# Allegro board LAY-97010_A2.brd
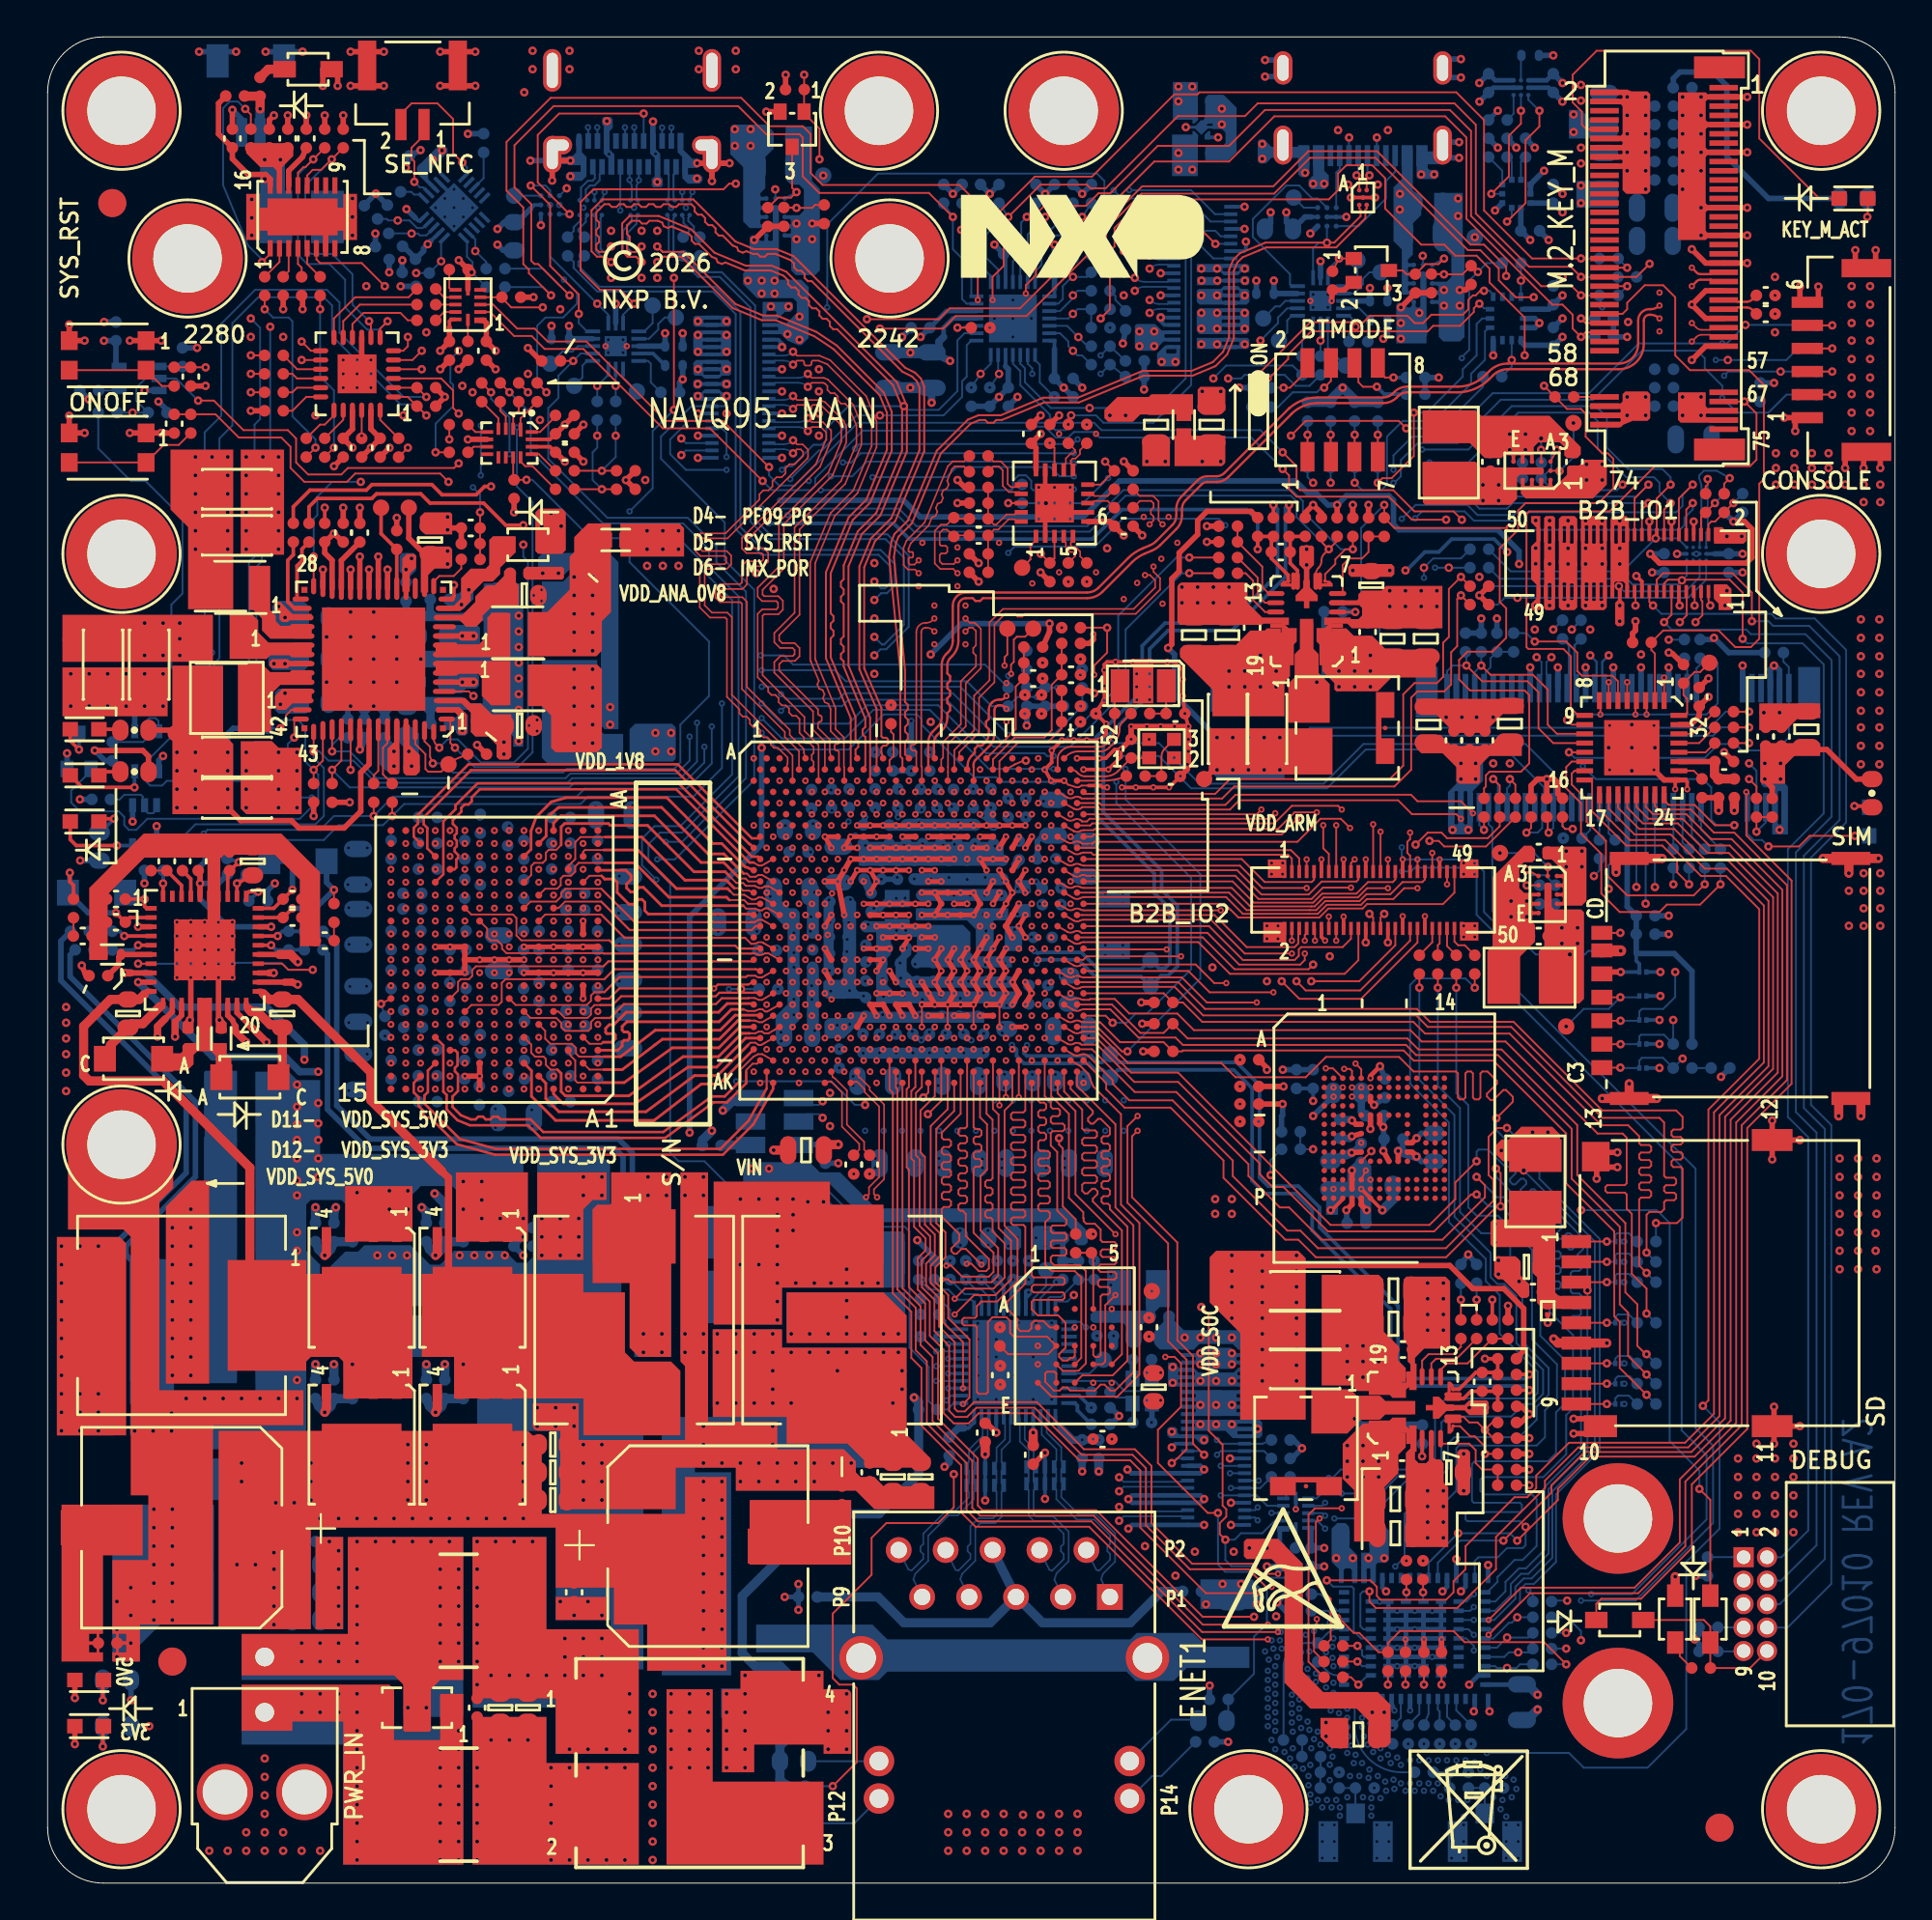
[diagram p0: board, top side]
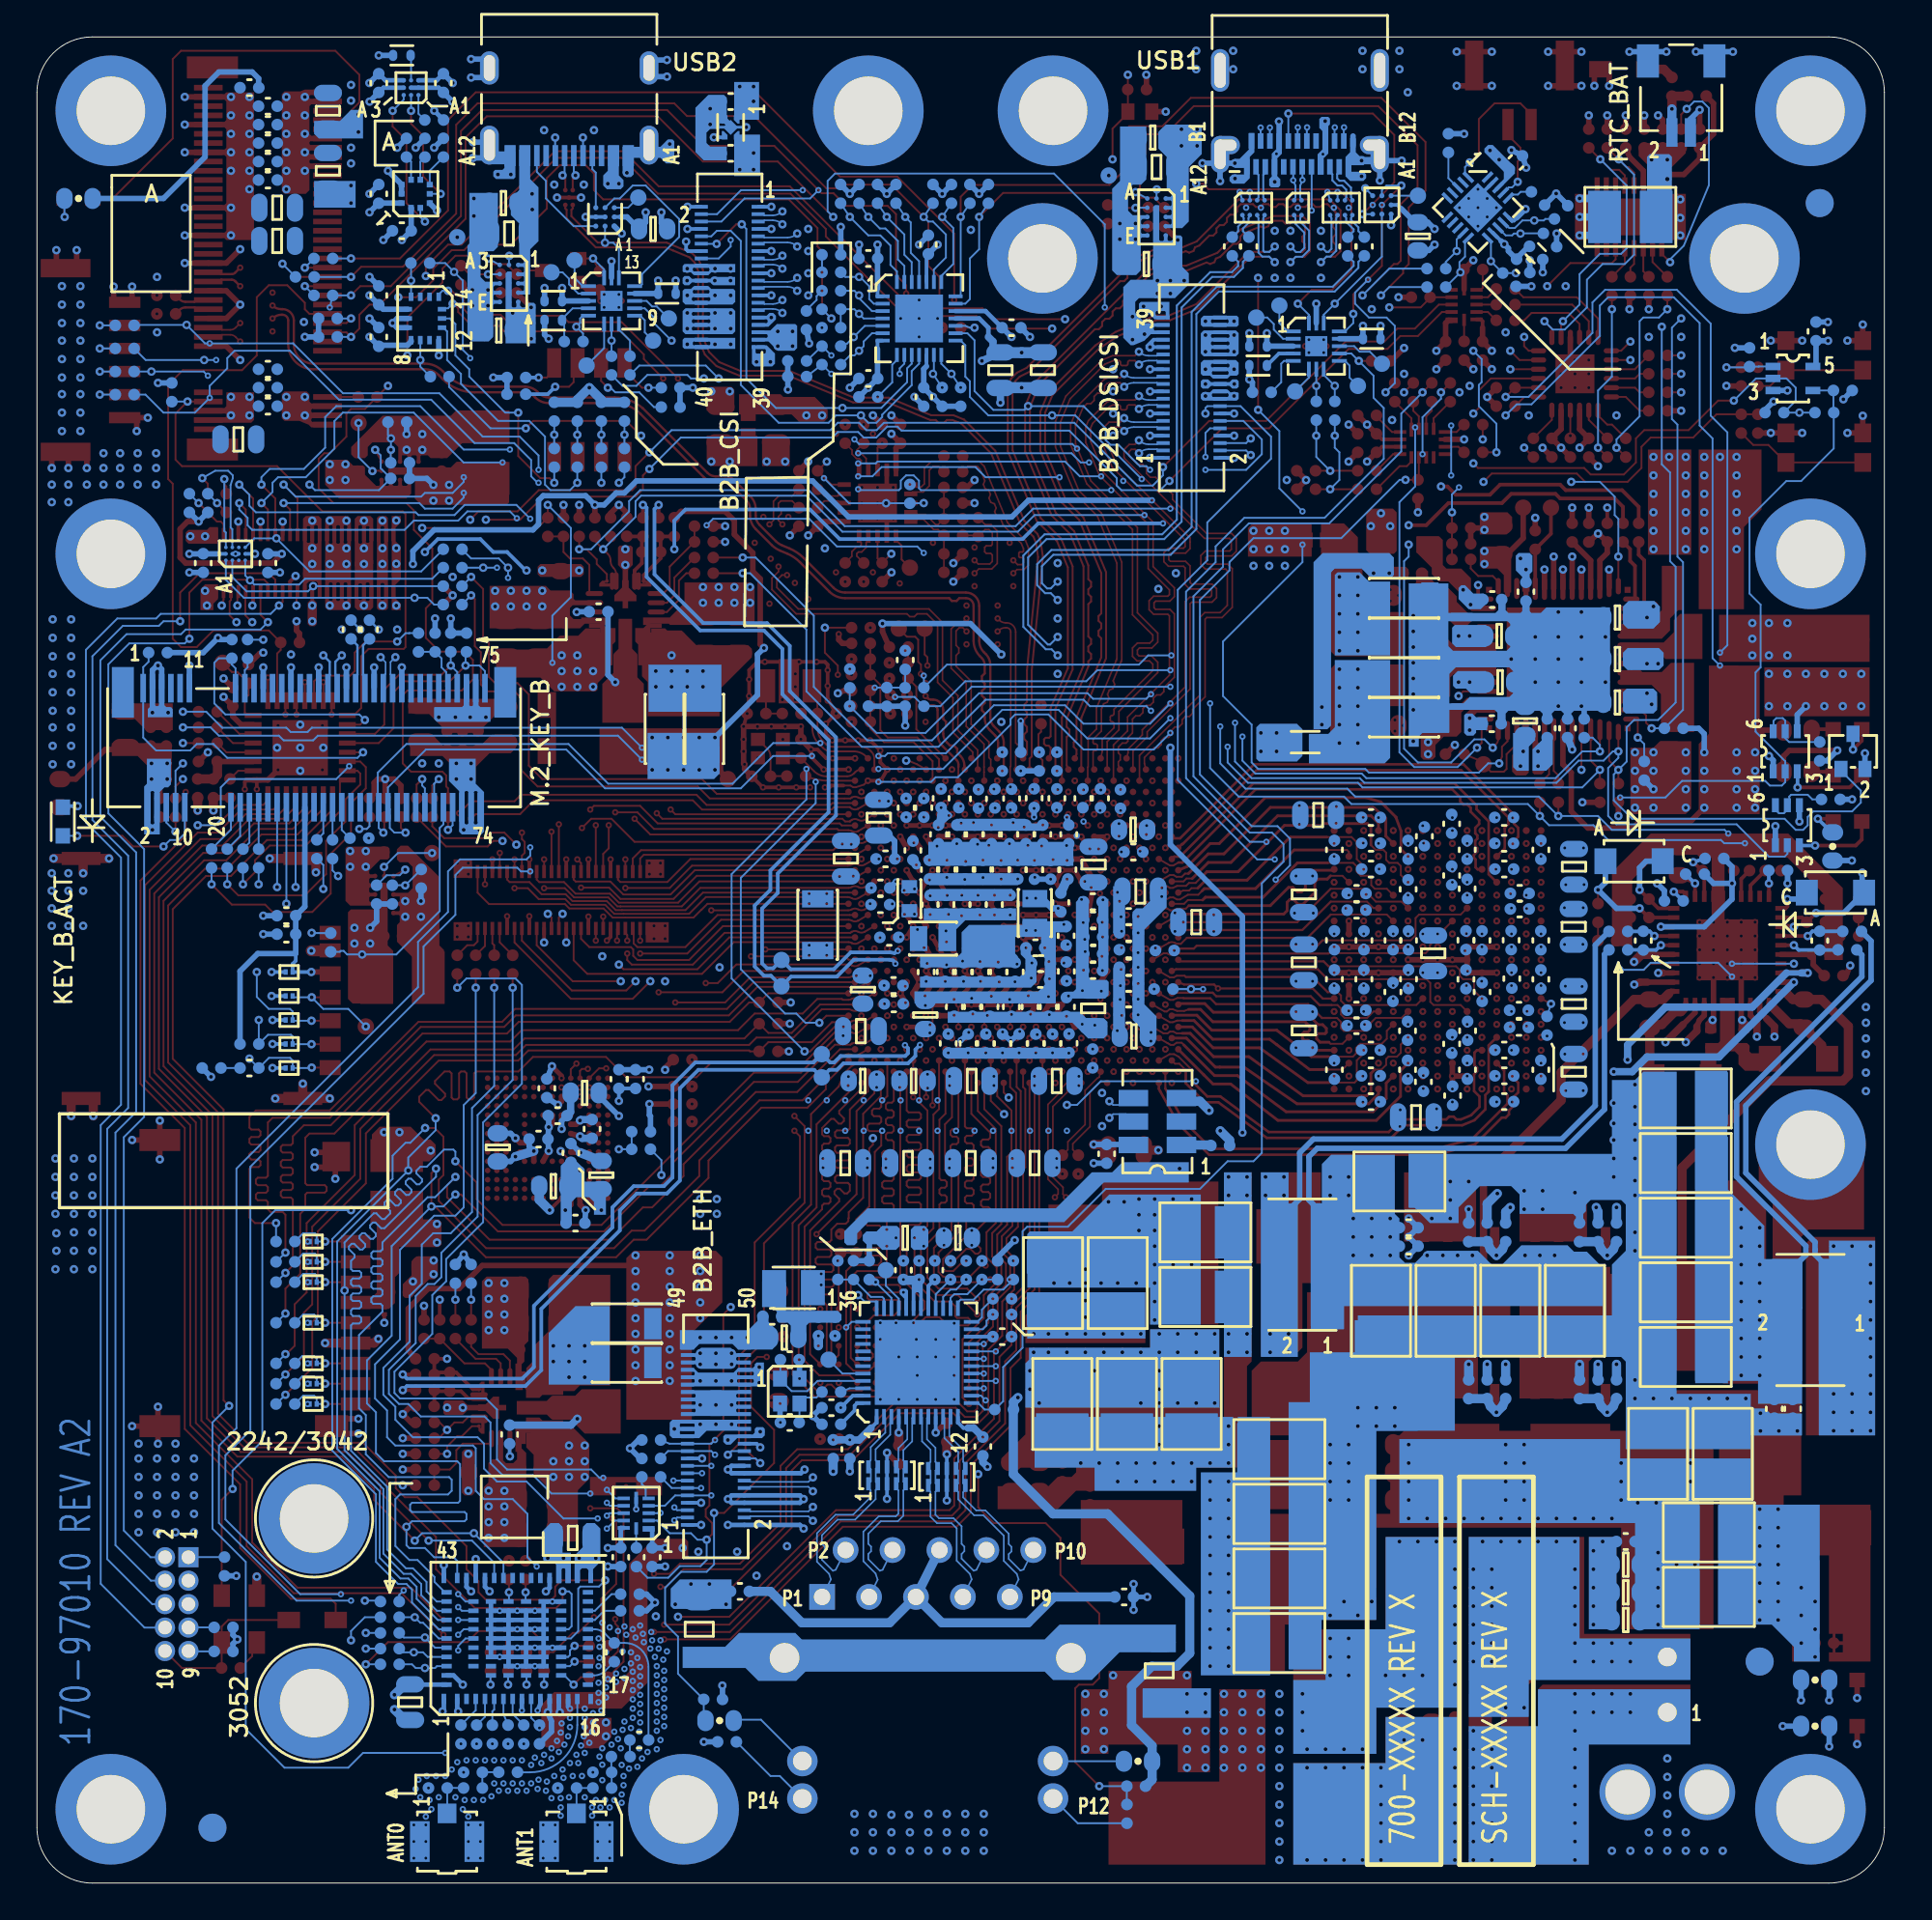
[diagram p1: board, bottom side, seen from below]

Outline 100 x 100 mm; copper layers: TOP, L2_GND1, L3_IN1, L4_GND2, L5_POWER1, L6_POWER2, L7_GND3, L8_IN2, L9_GND4, BOTTOM. Coordinates in mm from the lower left corner of the outline.
Outline path: 0,97 0,3 arc(0.88,0.88) 3,0 97,0 arc(99.12,0.88) 100,3 100,97 arc(99.12,99.12) 97,100 3,100 arc(0.88,99.12) 0,97

## Design rules (mm)
constraint set DEFAULT: min track width 0.102
net group CAN: nets CAN1_RX CAN1_TX
net group ETH_REF_PAD_CLK: nets ETH_REF_PAD_CLK_N ETH_REF_PAD_CLK_P
net group ETH_RX0_N: nets ETH_RX0_N SOC_ETH_RX0_N
net group ETH_RX0_P: nets ETH_RX0_P SOC_ETH_RX0_P
net group ETH_TX0_: nets ETH_TX0_N ETH_TX0_P
net group M2_KEYB_REFCLK_N: nets M2_KEYB_REFCLK_N M2_KEYB_REFCLK_R_N
net group M2_KEYB_REFCLK_P: nets M2_KEYB_REFCLK_P M2_KEYB_REFCLK_R_P
net group M2_KEYM_REFCLK_N: nets M2_KEYM_REFCLK_N M2_KEYM_REFCLK_R_N
net group M2_KEYM_REFCLK_P: nets M2_KEYM_REFCLK_P M2_KEYM_REFCLK_R_P
net group PCIE1_CLKIN_N: nets PCIE1_CLKIN_N PCIE1_CLKIN_R_N
net group PCIE1_CLKIN_P: nets PCIE1_CLKIN_P PCIE1_CLKIN_R_P
net group PCIE1_RX0_: nets PCIE1_RX0_N PCIE1_RX0_P
net group PCIE1_TX0_N: nets N20209195 PCIE1_TX0_N
net group PCIE1_TX0_P: nets N20209186 PCIE1_TX0_P
net group PCIE2_CLKIN_N: nets PCIE2_CLKIN_N PCIE2_CLKIN_R_N
net group PCIE2_CLKIN_P: nets PCIE2_CLKIN_P PCIE2_CLKIN_R_P
net group PCIE2_RX0_: nets PCIE2_RX0_N PCIE2_RX0_P
net group PCIE2_TX0_N: nets N20212275 PCIE2_TX0_N
net group PCIE2_TX0_P: nets N20212266 PCIE2_TX0_P
net group PCIE_CLKOUT_C_N: nets PCIE_CLKOUT_C_N PCIE_CLKOUT_N
net group PCIE_CLKOUT_C_P: nets PCIE_CLKOUT_C_P PCIE_CLKOUT_P
net group PF53_ARM_VMON: nets N20554848 PF53_ARM_VMON
net group PF53_SOC_VMON: nets N20554825 PF53_SOC_VMON
net group SD1_CLK: nets N20187351 SD1_CLK
net group SD2_CD_B: nets N21594290 SD2_CD_B
net group SD2_CLK: nets N20219774 SD2_CLK
net group SD2_CMD: nets N20219761 SD2_CMD
net group SD2_DATA0: nets N20219785 SD2_DATA0
net group SD2_DATA1: nets N20219794 SD2_DATA1
net group SD2_DATA2: nets N20219805 SD2_DATA2
net group SD2_DATA3: nets N20219813 SD2_DATA3
net group USB1_CONN_D: nets USB1_CONN_DN USB1_CONN_DP
net group USB1_CONN_RX0_: nets USB1_CONN_RX0_N USB1_CONN_RX0_P
net group USB1_CONN_RX1_: nets USB1_CONN_RX1_N USB1_CONN_RX1_P
net group USB1_CONN_TX0_: nets USB1_CONN_TX0_N USB1_CONN_TX0_P
net group USB1_CONN_TX1_: nets USB1_CONN_TX1_N USB1_CONN_TX1_P
net group USB1_RX0_: nets USB1_RX0_N USB1_RX0_P
net group USB1_RX1_: nets USB1_RX1_N USB1_RX1_P
net group USB1_TX0_N: nets USB1_TX0_C_N USB1_TX0_N
net group USB1_TX0_P: nets USB1_TX0_C_P USB1_TX0_P
net group USB1_TX1_N: nets USB1_TX1_C_N USB1_TX1_N
net group USB1_TX1_P: nets USB1_TX1_C_P USB1_TX1_P
net group USB2_CONN_D: nets USB2_CONN_DN USB2_CONN_DP
net group USB2_D: nets USB2_DN USB2_DP
net group 50_OHMS_CPWG: nets N20199453 N20199548 N20199550 N20199556 N20199632 N20199634 N20199638 N20199640
net group CLK_SE: nets DEBUG_TCLK_SWCLK GPIO15_SPI8_SCK M2_SMBUS_CLK RTC_CLKOUT_32K SAI2_TX_BCLK SE_SMBUS_CLK UIM_CLK
net group DRAM_DATA_0A: nets DRAM_DATA0_A DRAM_DATA1_A DRAM_DATA2_A
net group I2C: nets I2C2_SCL I2C2_SDA I2C3_SCL I2C3_SDA I2C4_SCL I2C4_SDA
net group I3C: nets I3C1_SCL_1V8 I3C1_SCL_3V3 I3C1_SDA_1V8 I3C1_SDA_3V3 I3C2_SCL_1V8 I3C2_SDA_1V8 I3C2A_SCL_1V8 I3C2A_SDA_1V8 I3C2B_SCL_1V8 I3C2B_SDA_1V8 I3C2C_SCL_1V8 I3C2C_SDA_1V8
net group MIPI_CSI: nets MIPI_CSI_CLK_N MIPI_CSI_D0_N MIPI_CSI_D3_N
net group MIPI_CSI_CLK_: nets MIPI_CSI_CLK_P
net group MIPI_CSI_D0_: nets MIPI_CSI_D0_P
net group MIPI_CSI_D3_: nets MIPI_CSI_D3_P
net group MIPI_DSICSI: nets MIPI_DSICSI_CLK_N MIPI_DSICSI_D0_N MIPI_DSICSI_D1_N MIPI_DSICSI_D2_N MIPI_DSICSI_D3_N
net group MIPI_DSICSI_CLK_: nets MIPI_DSICSI_CLK_P
net group MIPI_DSICSI_D0_: nets MIPI_DSICSI_D0_P
net group MIPI_DSICSI_D1_: nets MIPI_DSICSI_D1_P
net group MIPI_DSICSI_D2_: nets MIPI_DSICSI_D2_P
net group MIPI_DSICSI_D3_: nets MIPI_DSICSI_D3_P
net group POWER: nets DVDD10_RTL N20192671 N20193405 N20193407 N20196046 N20196509 N20196513 N20230991 N20938254 N20938524 N20938526 N20938619 N20938665 N20938713 N20938715 N20938759 N20938761 N20939031 N20939033 N20939085 N20939087 N20939402 N20939416 N20939428 N20939534 N20939536 N22195496 N22196044 N22196802 N22196850 N22209029 N23164149 UIM_PWR VANA_PF09 VCC_LM5143 VDD_BAT VDD_BATF VDD_BBSM_0V8 VDDA_LM5143 VDIG_PF09 VSS_BAT VSS_BATF
net group RTL8211_TD1_: nets RTL8211_TD1_P
net group RTL8211_TD2_: nets RTL8211_TD2_P
net group RTL8211_TD3_: nets RTL8211_TD3_P
net group RTL8211_TD4_: nets RTL8211_TD4_P
net group SD1: nets SD2_RESET_B
net group SD2: nets SD2_VSEL
net group SPI1: nets SPI1_IMU1_PCS0/BT_MODE2 SPI1_IMU1_SCK/BT_MODE3 SPI1_IMU1_SIN SPI1_IMU1_SOUT
net group SPI4: nets SPI4_PCS0 SPI4_PCS1 SPI4_PCS2 SPI4_SCK SPI4_SIN SPI4_SOUT
net group SPI4_1V8: nets SPI4_PCS0_1V8 SPI4_SCK_1V8 SPI4_SIN_1V8 SPI4_SOUT_1V8
net group VSENSE_VMON_FB: nets N20938813 N20938851 N20939149 N20939151 N20939169 N20939171 PF53_ARM_FB- PF53_SOC_FB- PMIC_XFB VDD_ARM_SENSE VDD_SOC_SENSE VSS_ARM_SENSE VSS_SOC_SENSE

## Placement (name value [footprint] x y rotation side)
BH1  MH3.7_6  [MH236-146P]  4 96 0 top
BH2  MH3.7_6  [MH236-146P]  45 96 0 top
BH3  MH3.7_6  [MH236-146P]  55 96 0 top
BH4  MH3.7_6  [MH236-146P]  96 96 0 top
BH5  MH3.7_6  [MH236-146P]  85 19.75 90 bottom
BH6  MH3.7_6  [MH236-146P]  45.58 88 0 top
BH7  MH3.7_6  [MH236-146P]  4 72 0 top
BH8  MH3.7_6  [MH236-146P]  96 72 0 top
BH9  MH3.7_6  [MH236-146P]  4 40 0 top
BH10  MH3.7_6  [MH236-146P]  85 9.75 90 bottom
BH11  MH3.7_6  [MH236-146P]  7.58 88 0 top
BH12  MH3.7_6  [MH236-146P]  4 4 0 top
BH13  MH3.7_6  [MH236-146P]  65 4 0 top
BH14  MH3.7_6  [MH236-146P]  96 4 0 top
C1  0.1uF  [CC0402_25]  10 94.5 90 top
C2  0.1uF  [CC0402_25]  13 94.5 90 top
C3  0.1uF  [CC0402_25]  14 94.5 90 top
C4  0.22uF  [CC0402_25]  93 86 180 top
C5  0.22uF  [CC0402_25]  93 85 180 top
C6  0.1uF  [CC0402_25]  21.75 83 270 top
C7  0.1uF  [CC0402_25]  23.75 83 270 top
C8  100pF  [CC0402_25]  7.75 81.6 270 top
C9  100pF  [CC0402_25]  6.85 79.05 270 top
C10  10uF  [CC0805_OV]  60 79 270 top
C11  10uF  [CC0805_OV]  63 79 90 top
C12  0.1uF  [CC0402_25]  28 78.5 0 top
C13  0.1uF  [CC0402_25]  53.25 78.5 90 top
C14  0.1uF  [CC0402_25]  16 77.75 270 top
C15  0.1uF  [CC0402_25]  18 77.75 270 top
C16  0.1uF  [CC0402_25]  28 77.5 0 top
C17  47uF  [CC1210]  75.84 77.49 90 top
C18  1uF  [CC0402_25]  78.09 76.99 90 top
C19  1uF  [CC0402_25]  82.64 76.99 90 top
C20  22uF  [1206_CC]  10.25 75.5 0 top
C21  0.1uF  [CC0402_25]  50.4 73.9 0 top
C22  0.1uF  [CC0402_25]  58.25 73.5 0 top
C23  0.1uF  [CC0402_25]  22.9 73.4 180 top
C24  1uF  [CC0402_25]  16 73.15 90 top
C25  1uF  [CC0402_25]  16.9 73.15 90 top
C26  22uF  [1206_CC]  10.25 73 0 top
C27  0.1uF  [CC0402_25]  50.4 73 0 top
C28  2.2uF  [CC0603_OV]  20.7 72.75 90 top
C29  220 pF  [CC0402_25]  66.75 72.1 0 top
C30  4.7uF  [CC0603_OV]  71.65 70.3 90 top
C31  4.7uF  [CC0603_OV]  25.8 69.75 0 top
C32  0.1uF  [CC0402_25]  65.2 68 270 top
C33  0.1uF  [CC0402_25]  71.45 67.77 270 top
C34  10uF  [CC0805_OV]  62.05 67.6 270 top
C35  10uF  [CC0805_OV]  63.85 67.6 270 top
C36  10uF  [CC0805_OV]  72.8 67.4 270 top
C37  10uF  [CC0805_OV]  74.6 67.4 270 top
C38  22uF  [1206_CC]  3 66 270 top
C39  22uF  [1206_CC]  5.5 66 270 top
C40  0.1uF  [CC0402_25]  55.4 65.45 0 top
C41  0.1uF  [CC0402_25]  53.35 65.25 0 top
C42  0.1uF  [CC0402_25]  89.4 64.25 90 top
C43  10pF  [CC0402_25]  57.25 63.35 180 top
C44  10pF  [CC0402_25]  61.05 63.35 0 top
C45  0.1uF  [CC0402_25]  55.4 62.9 0 top
C46  10uF  [CC0805_OV]  74.75 62.75 90 top
C47  10uF  [CC0805_OV]  79.15 62.8 90 top
C48  4.7uF  [CC0603_OV]  25.55 62.7 0 top
C49  47uF  [1206_CC]  63.9 62.52 90 top
C50  47uF  [1206_CC]  66 62.52 90 top
C51  10uF  [CC0805_OV]  95.2 62.5 90 top
C52  0.1uF  [CC0402_25]  93 62.1 90 top
C53  0.1uF  [CC0402_25]  93.85 62.1 90 top
C54  0.1uF  [CC0402_25]  76.12 61.9 90 top
C55  0.1uF  [CC0402_25]  76.96 61.9 90 top
C56  0.1uF  [CC0402_25]  77.8 61.9 90 top
C57  12pF  [CC0402_25]  58.65 61.45 90 top
C58  22uF  [1206_CC]  10.25 61 0 top
C59  0.1uF  [CC0402_25]  90.75 60.75 0 top
C60  12pF  [CC0402_25]  60.8 59.95 0 top
C61  22uF  [1206_CC]  10.25 58.75 0 top
C62  1uF  [CC0402_25]  80.71 55.84 180 top
C63  0.01uF  [CC0402_25]  6.45 55.35 90 top
C64  0.47uF  [CC0402_25]  8.15 55.35 90 top
C65  0.82uF  [CC0603_OV]  11.1 55.35 90 top
C66  0.22uF  [CC0402_25]  3.7 53.3 180 top
C67  0.22uF  [CC0402_25]  13.25 53.3 0 top
C68  2.7pF  [CC0402_25]  3.7 52.05 180 top
C69  6.8pF  [CC0402_25]  13.25 52.3 0 top
C70  470pF  [CC0402_25]  1.9 51.3 0 top
C71  1uF  [CC0402_25]  80.71 51.29 180 top
C72  680pF  [CC0402_25]  15 51.05 180 top
C73  2.2uF  [CC0402_TOL0P2_OV]  3.5 50.3 180 top
C74  47uF  [CC1210]  80.21 49.04 180 top
C75  0.1uF  [CC0603_OV]  4.35 47.1 90 top
C76  0.1uF  [CC0603_OV]  12.7 47.1 90 top
C77  2.2uF  [CC0402_TOL0P2_OV]  7.6 45.75 90 top
C78  2.2uF  [CC0402_TOL0P2_OV]  9.4 45.75 90 top
C79  0.1uF  [CC0402_25]  43.63 38.92 270 top
C80  0.1uF  [CC0402_25]  44.5 38.92 270 top
C81  47uF  [CC1210]  80.53 38.01 90 top
C82  4.7uF  [CC0603_OV]  80.05 33.38 180 top
C83  10uF  [CC0805_OV]  72.85 32.1 180 top
C84  47uF  [1206_CC]  68.07 32.05 0 top
C85  0.1uF  [CC0402_25]  80.4 32.01 180 top
C86  10uF  [CC0805_OV]  72.85 30.3 180 top
C87  0.1uF  [CC0402_25]  59.62 30.11 90 top
C88  47uF  [1206_CC]  68.07 29.95 0 top
C89  0.1uF  [CC0402_25]  73.37 28.9 180 top
C90  47uF  [1206_CC]  68.07 27.85 0 top
C91  0.1uF  [CC0402_25]  51.57 27.51 270 top
C92  220 pF  [CC0402_25]  77.65 27.15 270 top
C93  4.7uF  [CC0603_OV]  59.87 26.86 270 top
C94  0.1uF  [CC0402_25]  57.1 24.05 0 top
C95  0.01uF  [CC0603_OV]  27.35 23.75 0 top
C96  0.1uF  [CC0402_25]  73.32 22.45 180 top
C97  0.1uF  [CC0603_OV]  27.35 22.25 0 top
C98  4.7uF  [CC0603_OV]  75.85 22.25 0 top
C99  0.1uF  [CC0603_OV]  45.75 22 270 top
C100  0.01uF  [CC0603_OV]  47.25 22 270 top
C101  1000pF  [CC0402_25]  44.5 22.25 270 top
C102  10uF  [CC0805_OV]  72.95 20.8 180 top
C103  0.01uF  [CC0603_OV]  27.35 20.75 0 top
C104  47uF  [CCE10_3X10_3_413H]  7.25 19.25 180 top
C105  10uF  [CC0805_OV]  72.95 18.95 180 top
C106  47uF  [CCE10_3X10_3_413H]  35.75 18.25 0 top
C107  1000pF  [CC0402_25]  14 18.5 0 bottom
C108  1000pF  [CC0402_25]  28.5 15.75 270 top
C109  0.01uF  [CC0603_OV]  14 17.25 0 bottom
C110  0.01uF  [CC0603_OV]  14 15.75 0 bottom
C111  0.1uF  [CC0603_OV]  14 14.25 0 bottom
C112  10uF  [CC0805_OV]  70.95 8.05 180 top
C113  1uF  [FLTR4_1206_SM]  20 9.5 180 top
C114  1000pF  [CC0402_25]  23.25 9.5 90 top
C115  0.01uF  [CC0603_OV]  24.5 9.5 90 top
C116  0.1uF  [CC0603_OV]  26 9.5 90 top
C117  2.2uF  [CC0402_TOL0P2_OV]  80.25 99 0 bottom
C118  0.1uF  [CC0402_25]  81.5 97.5 90 bottom
C119  0.1uF  [CC0402_25]  78 97.5 270 bottom
C120  0.1uF  [CC0402_25]  88.5 97.25 0 bottom
C121  0.1uF  [CC0402_25]  87.5 96.25 0 bottom
C122  10uF  [CC0805_OV]  84.25 96 270 bottom
C123  1uF  [CC0402_25]  62.45 96.5 0 bottom
C124  1uF  [CC0402_25]  62.45 93.7 0 bottom
C125  0.1uF  [CC0402_25]  87.5 95.25 0 bottom
C126  1uF  [CC0603_OV]  39.6 94.55 0 bottom
C127  0.1uF  [CC0402_25]  87.5 94.25 0 bottom
C128  0.1uF  [CC0402_25]  87.5 93.25 0 bottom
C129  0.1uF  [CC0402_25]  19.95 93.2 135 bottom
C130  10uF  [CC0805_OV]  39.4 92.95 0 bottom
C131  10uF  [CC0805_OV]  84.25 92.75 270 bottom
C132  0.1uF  [CC0402_25]  87.5 92.25 0 bottom
C133  0.1uF  [CC0402_25]  81.5 91.5 90 bottom
C134  1uF  [CC0603_OV]  74.75 91 0 bottom
C135  10uF  [CC0805_OV]  87 90.75 0 bottom
C136  47uF  [CC1210]  13.75 90.25 0 bottom
C137  1uF  [CC0603_OV]  66.65 89.6 180 bottom
C138  0.1uF  [CC0402_25]  80.25 89.5 0 bottom
C139  10uF  [CC0805_OV]  74.45 89.35 0 bottom
C140  1uF  [CC0603_OV]  25.25 89.2 270 bottom
C141  10uF  [CC0805_OV]  87 88.95 0 bottom
C142  1uF  [CC0402_25]  51.75 88.75 90 bottom
C143  0.1uF  [CC0402_25]  35.3 88.65 270 bottom
C144  0.1uF  [CC0402_25]  34.4 88.65 270 bottom
C145  0.1uF  [CC0402_25]  29.05 88.65 270 bottom
C146  0.1uF  [CC0402_25]  28.15 88.65 270 bottom
C147  1uF  [CC0402_25]  55 88 0 bottom
C148  1uF  [CC0603_OV]  39.95 87.7 0 bottom
C149  0.1uF  [CC0402_25]  19.55 87.6 225 bottom
C150  2.2uF  [CC0402_TOL0P2_OV]  65.9 86.1 180 bottom
C151  0.1uF  [CC0402_25]  81.5 86 90 bottom
C152  2.2uF  [CC0402_TOL0P2_OV]  72.05 85.7 0 bottom
C153  2.2uF  [CC0402_TOL0P2_OV]  72.05 84.65 0 bottom
C154  1uF  [CC0402_25]  47.25 84.25 180 bottom
C155  1uF  [CC0603_OV]  75 84.1 0 bottom
C156  0.1uF  [CC0402_25]  3.7 84.05 90 bottom
C157  0.1uF  [CC0402_25]  81.5 83.75 90 bottom
C158  2.2uF  [CC0402_TOL0P2_OV]  27.75 83.65 180 bottom
C159  2.2uF  [CC0402_TOL0P2_OV]  33.9 83.25 0 bottom
C160  2.2uF  [CC0402_TOL0P2_OV]  33.9 82.2 0 bottom
C161  0.1uF  [CC0402_25]  87.5 82 0 bottom
C162  10uF  [CC0805_OV]  47.85 81.95 270 bottom
C163  10uF  [CC0805_OV]  45.55 81.95 270 bottom
C164  1uF  [CC0402_25]  55 81.5 0 bottom
C165  0.1uF  [CC0402_25]  87.5 81 0 bottom
C166  1uF  [CC0402_25]  52 80.5 270 bottom
C167  0.1uF  [CC0402_25]  87.5 80 0 bottom
C168  10uF  [CC0805_OV]  89.1 78.2 0 bottom
C169  0.1uF  [CC0402_25]  91 71.5 270 bottom
C170  0.1uF  [CC0402_25]  87.5 71.5 270 bottom
C171  1uF  [CC0402_25]  19.4 69.95 270 bottom
C172  22uF  [1206_CC]  26 69.6 180 bottom
C173  1uF  [CC0402_25]  21.22 69.53 180 bottom
C174  0.1uF  [CC0402_25]  69.6 68.87 180 bottom
C175  4.7uF  [CC0603_OV]  14.45 68.55 0 bottom
C176  0.22uF  [CC0402_25]  83 67.9 270 bottom
C177  0.22uF  [CC0402_25]  82 67.9 270 bottom
C178  4.7uF  [CC0603_OV]  20.85 67.55 180 bottom
C179  22uF  [1206_CC]  26 67.45 180 bottom
C180  4.7uF  [CC0603_OV]  14.45 66.3 0 bottom
C181  1000pF  [CC0402_25]  53 66.25 90 bottom
C182  22uF  [1206_CC]  26 65.3 180 bottom
C183  4.7uF  [CC0603_OV]  20.8 65.05 180 bottom
C184  4.7uF  [CC0603_OV]  14.45 63.95 0 bottom
C185  22uF  [1206_CC]  26 63.15 180 bottom
C186  4.7uF  [CC0603_OV]  19.45 62.95 90 bottom
C187  1uF  [CC0402_25]  21.25 62.8 180 bottom
C188  1uF  [CC0402_25]  18.25 62.55 90 bottom
C189  1uF  [CC0402_25]  17.15 62.55 90 bottom
C190  47uF  [1206_CC]  66 62.52 90 bottom
C191  47uF  [1206_CC]  63.9 62.52 90 bottom
C192  1uF  [CC0402_25]  46.02 58.77 90 bottom
C193  1uF  [CC0402_25]  51.06 58.76 90 bottom
C194  1uF  [CC0402_25]  44.79 58.76 90 bottom
C195  1uF  [CC0402_25]  43.39 58.76 90 bottom
C196  1uF  [CC0402_25]  42.43 58.76 90 bottom
C197  1uF  [CC0402_25]  47.24 58.75 90 bottom
C198  1uF  [CC0402_25]  49.04 58.73 90 bottom
C199  10uF  [CC0805_OV]  30.65 57.85 0 bottom
C200  1uF  [CC0402_25]  52.95 58.25 90 bottom
C201  1uF  [CC0402_25]  51.99 58.25 90 bottom
C202  1uF  [CC0402_25]  20.58 57.72 0 bottom
C203  1uF  [CC0402_25]  27.79 57.72 180 bottom
C204  10uF  [CC0805_OV]  54.43 57.71 90 bottom
C205  1uF  [CC0402_25]  23.42 57.38 270 bottom
C206  2.2uF  [CC0603_OV]  40.67 57.06 180 bottom
C207  1uF  [CC0402_25]  51.2 56.81 270 bottom
C208  1uF  [CC0402_25]  50.21 56.81 270 bottom
C209  1uF  [CC0402_25]  49.24 56.81 270 bottom
C210  0.1uF  [CC0402_25]  48.33 56.81 270 bottom
C211  1uF  [CC0402_25]  47.36 56.81 270 bottom
C212  1uF  [CC0402_25]  46.47 56.81 270 bottom
C213  0.22uF  [CC0402_25]  45.55 56.81 270 bottom
C214  1uF  [CC0402_25]  44.15 56.81 270 bottom
C215  1uF  [CC0402_25]  24.9 56.7 270 bottom
C216  1uF  [CC0402_25]  27.79 56.32 180 bottom
C217  1uF  [CC0402_25]  20.58 56.32 0 bottom
C218  1uF  [CC0402_25]  25.78 55.97 270 bottom
C219  1uF  [CC0402_25]  22.58 55.97 270 bottom
C220  1uF  [CC0402_25]  29.77 55.97 270 bottom
C221  1uF  [CC0402_25]  18.59 55.97 270 bottom
C222  0.1uF  [CC0402_25]  52.59 55.93 90 bottom
C223  1uF  [CC0402_25]  40.65 55.85 180 bottom
C224  10uF  [CC0805_OV]  16.8 55.05 90 bottom
C225  10uF  [CC0805_OV]  56.21 55.49 90 bottom
C226  1uF  [CC0402_25]  54.07 55.48 0 bottom
C227  10uF  [CC0805_OV]  42.81 55.17 90 bottom
C228  1uF  [CC0402_25]  27.79 54.93 0 bottom
C229  1uF  [CC0402_25]  20.57 54.93 180 bottom
C230  0.22uF  [CC0402_25]  51.69 54.9 90 bottom
C231  0.22uF  [CC0402_25]  50.74 54.9 90 bottom
C232  1uF  [CC0402_25]  49.76 54.9 90 bottom
C233  0.22uF  [CC0402_25]  48.8 54.9 90 bottom
C234  0.22uF  [CC0402_25]  47.83 54.9 90 bottom
C235  0.22uF  [CC0402_25]  46.91 54.9 90 bottom
C236  0.1uF  [CC0402_25]  44.19 54.89 90 bottom
C237  0.1uF  [CC0402_25]  46.01 54.89 90 bottom
C238  0.22uF  [CC0402_25]  45.13 54.89 90 bottom
C239  1uF  [CC0402_25]  23.42 54.58 270 bottom
C240  0.1uF  [CC0402_25]  54.35 53.9 0 bottom
C241  1uF  [CC0402_25]  22.58 53.86 270 bottom
C242  1uF  [CC0402_25]  25.78 53.83 270 bottom
C243  10uF  [CC0805_OV]  40.28 53.71 180 bottom
C244  1uF  [CC0402_25]  19.74 53.61 180 bottom
C245  1uF  [CC0402_25]  28.57 53.6 0 bottom
C246  10uF  [CC0805_OV]  31.42 53.55 270 bottom
C247  2.2uF  [0603_CC]  52.78 53.32 270 bottom
C248  0.22uF  [CC0402_25]  44.58 53.12 270 bottom
C249  1uF  [CC0402_25]  42.85 53.16 180 bottom
C250  0.22uF  [CC0402_25]  49.94 53 90 bottom
C251  0.22uF  [CC0402_25]  49.06 53 90 bottom
C252  1uF  [CC0402_25]  48.17 53 90 bottom
C253  0.22uF  [CC0402_25]  47.32 53 90 bottom
C254  0.22uF  [CC0402_25]  51.65 53 90 bottom
C255  0.22uF  [CC0402_25]  50.8 53 90 bottom
C256  1uF  [CC0402_25]  54.35 53 0 bottom
C257  1uF  [CC0402_25]  28.57 52.7 180 bottom
C258  22uF  [1206_CC]  57.74 51.91 270 bottom
C259  1uF  [CC0402_25]  19.74 52.77 0 bottom
C260  10uF  [0805_CC]  45.99 52.54 90 bottom
C261  0.1uF  [CC0402_25]  86.5 52.4 0 bottom
C262  1uF  [CC0402_25]  40.9 52.36 180 bottom
C263  1uF  [CC0402_25]  42.83 52.16 180 bottom
C264  10uF  [CC0805_OV]  16.82 51.8 90 bottom
C265  1uF  [CC0402_25]  53.87 51.23 0 bottom
C266  1uF  [CC0402_25]  40.9 51.47 180 bottom
C267  1uF  [CC0402_25]  86.5 51.4 0 bottom
C268  0.1uF  [CC0402_25]  44.29 51.31 270 bottom
C269  1uF  [CC0402_25]  42.82 51.25 180 bottom
C270  10uF  [0805_CC]  51.5 51.16 0 bottom
C271  1uF  [CC0402_25]  20.2 51.07 270 bottom
C272  1uF  [CC0402_25]  29.77 51.07 270 bottom
C273  1uF  [CC0402_25]  26.6 51.06 270 bottom
C274  1uF  [CC0402_25]  21.78 51.06 270 bottom
C275  1uF  [CC0402_25]  18.6 51.06 270 bottom
C276  1uF  [CC0402_25]  28.17 51.06 270 bottom
C277  1uF  [CC0402_25]  25.76 51.06 90 bottom
C278  1uF  [CC0402_25]  22.65 51.07 90 bottom
C279  33pF  [CC0402_25]  13.05 51.05 90 bottom
C280  33pF  [CC0402_25]  3.5 51.05 270 bottom
C281  1uF  [CC0402_25]  45.96 50.66 0 bottom
C282  1uF  [CC0402_25]  40.9 50.56 180 bottom
C283  10uF  [CC0805_OV]  24.42 50.36 90 bottom
C284  1uF  [CC0402_25]  42.83 50.34 180 bottom
C285  10uF  [CC0805_OV]  31.42 49.87 270 bottom
C286  0.1uF  [CC0402_25]  45.65 49.81 0 bottom
C287  1uF  [CC0402_25]  40.9 49.61 180 bottom
C288  1uF  [CC0402_25]  42.83 49.43 180 bottom
C289  1uF  [CC0402_25]  44.28 49.38 270 bottom
C290  1uF  [CC0402_25]  47.05 49.35 270 bottom
C291  0.22uF  [CC0402_25]  51.87 49.35 270 bottom
C292  1uF  [CC0402_25]  50.84 49.35 270 bottom
C293  0.22uF  [CC0402_25]  49.84 49.35 270 bottom
C294  1uF  [CC0402_25]  48.92 49.35 270 bottom
C295  0.1uF  [CC0402_25]  47.95 49.35 270 bottom
C296  1uF  [CC0402_25]  20.17 48.99 90 bottom
C297  1uF  [CC0402_25]  25.76 48.96 270 bottom
C298  1uF  [CC0402_25]  29.77 48.96 90 bottom
C299  1uF  [CC0402_25]  28.18 48.96 90 bottom
C300  1uF  [CC0402_25]  18.6 48.95 90 bottom
C301  1uF  [CC0402_25]  22.65 48.95 270 bottom
C302  1uF  [CC0402_25]  45.7 48.95 0 bottom
C303  1uF  [CC0402_25]  40.9 48.73 180 bottom
C304  1uF  [CC0402_25]  53.63 48.62 0 bottom
C305  2.2uF  [CC0603_OV]  55.29 48.4 90 bottom
C306  1uF  [CC0402_25]  26.61 48.27 270 bottom
C307  1uF  [CC0402_25]  21.77 48.27 270 bottom
C308  1uF  [CC0402_25]  40.9 47.88 180 bottom
C309  1uF  [CC0402_25]  53.62 47.63 0 bottom
C310  10uF  [CC0805_OV]  16.82 47.62 270 bottom
C311  1uF  [CC0402_25]  50.34 47.46 270 bottom
C312  0.1uF  [CC0402_25]  49.36 47.46 270 bottom
C313  1uF  [CC0402_25]  48.42 47.46 270 bottom
C314  1uF  [CC0402_25]  44.27 47.46 270 bottom
C315  1uF  [CC0402_25]  47.26 47.46 270 bottom
C316  1uF  [CC0402_25]  46.24 47.46 270 bottom
C317  0.1uF  [CC0402_25]  45.25 47.46 270 bottom
C318  10uF  [CC0805_OV]  42.83 47.38 270 bottom
C319  1uF  [CC0402_25]  28.58 47.28 180 bottom
C320  1uF  [CC0402_25]  19.78 47.28 0 bottom
C321  1uF  [CC0402_25]  40.9 47.03 180 bottom
C322  2.2uF  [CC0603_OV]  51.92 47.02 270 bottom
C323  1uF  [CC0402_25]  19.78 46.35 180 bottom
C324  1uF  [CC0402_25]  28.58 46.44 0 bottom
C325  10uF  [CC0805_OV]  31.42 46.19 90 bottom
C326  1uF  [CC0402_25]  25.81 46.17 90 bottom
C327  1uF  [CC0402_25]  22.56 46.16 90 bottom
C328  10uF  [CC0805_OV]  55.4 46.15 0 bottom
C329  2.2uF  [CC0603_OV]  40.63 45.86 180 bottom
C330  1uF  [CC0402_25]  44.13 45.49 270 bottom
C331  1uF  [CC0402_25]  50.67 45.48 270 bottom
C332  1uF  [CC0402_25]  49.59 45.48 270 bottom
C333  1uF  [CC0402_25]  48.64 45.48 270 bottom
C334  1uF  [CC0402_25]  47.73 45.48 270 bottom
C335  1uF  [CC0402_25]  46.84 45.48 270 bottom
C336  1uF  [CC0402_25]  45.93 45.48 270 bottom
C337  1uF  [CC0402_25]  45.03 45.48 270 bottom
C338  1uF  [CC0402_25]  23.42 45.46 90 bottom
C339  1uF  [CC0402_25]  27.79 45.12 0 bottom
C340  1uF  [CC0402_25]  20.58 45.12 180 bottom
C341  47pF  [CC0402_25]  88.5 44.15 0 bottom
C342  1uF  [CC0402_25]  25.81 44.06 90 bottom
C343  1uF  [CC0402_25]  22.57 44.06 90 bottom
C344  1uF  [CC0402_25]  18.6 44.06 90 bottom
C345  1uF  [CC0402_25]  29.77 44.06 90 bottom
C346  10uF  [CC0805_OV]  16.82 43.95 270 bottom
C347  1uF  [CC0402_25]  20.57 43.73 0 bottom
C348  1uF  [CC0402_25]  27.8 43.73 180 bottom
C349  0.22uF  [CC0402_25]  68.5 43.55 90 bottom
C350  2.2uF  [CC0603_OV]  52.55 43.45 180 bottom
C351  2.2uF  [CC0603_OV]  55.3 43.45 0 bottom
C352  1uF  [CC0402_25]  24.95 43.4 90 bottom
C353  0.22uF  [CC0402_25]  72.4 43.05 90 bottom
C354  1uF  [CC0402_25]  67.6 43.55 90 bottom
C355  1uF  [CC0402_25]  23.37 42.65 90 bottom
C356  10uF  [CC0805_OV]  49.4 43.45 0 bottom
C357  10uF  [CC0805_OV]  44.8 43.45 180 bottom
C358  1uF  [CC0402_25]  20.58 42.33 0 bottom
C359  1uF  [CC0402_25]  27.79 42.33 180 bottom
C360  47uF  [CC1210]  10.75 42.5 0 bottom
C361  0.22uF  [CC0402_25]  71.82 41.57 0 bottom
C362  10uF  [CC0805_OV]  25.36 41.48 180 bottom
C363  0.1uF  [CC0402_25]  42.1 39.5 270 bottom
C364  0.22uF  [CC0402_25]  69.95 40.85 270 bottom
C365  10uF  [CC0805_OV]  41.05 39.7 180 top
C366  0.22uF  [CC0402_25]  72.85 40.3 180 bottom
C367  4.7uF  [CC0603_OV]  75.05 39.85 90 bottom
C368  0.22uF  [CC0402_25]  71.1 39.55 90 bottom
C369  10uF  [CC0805_OV]  56.25 39 0 bottom
C370  10uF  [CC0805_OV]  52.85 39 0 bottom
C371  10uF  [CC0805_OV]  49.45 39 0 bottom
C372  10uF  [CC0805_OV]  46 39 0 bottom
C373  10uF  [CC0805_OV]  37.25 52.05 180 bottom
C374  4.7uF  [CC0603_OV]  72.05 37.75 0 bottom
C375  4.7uF  [CC0603_OV]  70.35 42.8 180 bottom
C376  47uF  [CC1210]  10.75 39 0 bottom
C377  0.22uF  [CC0402_25]  70.85 35.75 180 bottom
C378  47uF  [CC1210]  16.75 31 270 bottom
C379  47uF  [CC1210]  26.25 38 180 bottom
C380  0.01uF  [CC0402_25]  25.75 34.5 180 bottom
C381  0.1uF  [CC0402_25]  25.75 35.5 180 bottom
C382  0.01uF  [CC0402_25]  4.96 25.69 270 bottom
C383  10uF  [CC1210]  36.75 35.25 180 bottom
C384  4.7uF  [CC0603_OV]  69.45 38.35 90 bottom
C385  47uF  [CC1210]  10.75 35.5 0 bottom
C386  0.1uF  [CC0402_25]  5.96 25.69 270 bottom
C387  4.7uF  [CC0603_OV]  53 34.95 180 bottom
C388  4.7uF  [CC0603_OV]  50.15 34.95 180 bottom
C389  10uF  [CC1210]  36.75 31.75 180 bottom
C390  47uF  [1206_CC]  68.07 30.3 0 bottom
C391  0.1uF  [CC0402_25]  53.1 33.2 90 bottom
C392  0.1uF  [CC0402_25]  52.25 33.2 90 bottom
C393  0.1uF  [CC0402_25]  51.4 33.2 90 bottom
C394  10uF  [CC1210]  45 32.5 270 bottom
C395  10uF  [CC1210]  41.5 32.5 270 bottom
C396  47uF  [CC1210]  10.75 32 0 bottom
C397  47uF  [CC1210]  23.75 31 270 bottom
C398  47uF  [CC1210]  20.25 31 270 bottom
C399  47uF  [CC1210]  27.25 31 270 bottom
C400  47uF  [1206_CC]  68.07 28.2 0 bottom
C401  0.1uF  [CC0402_25]  60.2 30.7 0 bottom
C402  0.1uF  [CC0402_25]  47.75 29.6 180 bottom
C403  47uF  [CC1210]  10.75 28.5 0 bottom
C404  4.7uF  [CC0603_OV]  59.55 29.55 0 bottom
C405  27pF  [CC0402_25]  59.25 28.35 180 bottom
C406  10uF  [CC1210]  44.5 25.95 270 bottom
C407  10uF  [CC1210]  41 25.95 270 bottom
C408  10uF  [CC1210]  37.5 25.95 270 bottom
C409  0.1uF  [CC0402_25]  57 25.75 0 bottom
C410  0.1uF  [CC0402_25]  74.42 24.3 90 bottom
C411  10uF  [CC1210]  32.75 23.5 180 bottom
C412  10uF  [CC1210]  12.25 23.25 90 bottom
C413  10uF  [CC1210]  8.75 23.25 90 bottom
C414  27pF  [CC0402_25]  59.25 24.95 0 bottom
C415  0.1uF  [CC0402_25]  56 23.5 270 bottom
C416  0.1uF  [CC0402_25]  50.75 24.4 270 top
C417  0.1uF  [CC0402_25]  53.35 23.2 270 top
C418  0.1uF  [CC0402_25]  48.8 23.65 270 bottom
C419  10uF  [CC1210]  32.75 20 180 bottom
C420  10uF  [CC1210]  9.5 19 180 bottom
C421  10uF  [CC0805_OV]  71 18.7 180 bottom
C422  0.01uF  [CC0402_25]  61.95 15.8 0 bottom
C423  10uF  [CC1210]  32.75 16.5 180 bottom
C424  0.01uF  [CC0402_25]  41.15 15.5 180 bottom
C425  10uF  [CC1210]  9.5 15.5 180 bottom
C426  10uF  [CC1210]  32.75 13 180 bottom
C427  10pF  [CC0402_25]  68.75 12.5 270 bottom
C428  1000pF  [CC1206_OV]  39.25 11.5 270 bottom
C429  10uF  [CC0805_OV]  79.8 9.8 270 bottom
C430  10pF  [CC0402_25]  67.4 7.75 0 bottom
C431  0.1uF  [CC0402_25]  68.4 17.65 270 bottom
C432  0.1uF  [CC0402_25]  66.7 17.65 270 bottom
D1  BAT54HT1  [SOD323]  14.1 98.25 270 top
D2  LED_GRN  [LED_0603]  97.75 91.25 180 top
D3  BAT54HT1  [SOD323]  26 72.5 270 top
D4  LED_YEL  [LED_0603]  2 62.5 180 top
D5  LED_SUPER_RED  [LED_0603]  2 60 180 top
D6  LED_AMB  [LED_0603]  2 57.5 180 top
D7  SS10100FL_R1_00001  [SOD123FL]  4.65 44.65 0 top
D8  SS10100FL_R1_00001  [SOD123FL]  10.95 43.65 180 top
D9  DESD5V0X1BCSF  [X2-DFN0603-2]  81.2 31 270 top
D10  NSR0320  [SOD323]  85.1 14.25 90 top
D11  BLUE LED  [LED_0603]  2.25 11 180 top
D12  LED_GRN  [LED_0603]  2.25 8.5 180 top
D13  NSR0320  [SOD323]  88.1 14.3 0 top
D14  NSR0320  [SOD323]  90 14.3 0 top
D15  LED_GRN  [LED_0603]  98.6 57.5 270 bottom
D16  SS10100FL_R1_00001  [SOD123FL]  13.55 55.35 0 bottom
D17  SS10100FL_R1_00001  [SOD123FL]  2.65 53.65 180 bottom
D18  DESD5V0X1BCSF  [X2-DFN0603-2]  86.35 49.35 180 bottom
D19  DESD5V0X1BCSF  [X2-DFN0603-2]  86.35 48.05 180 bottom
D20  DESD5V0X1BCSF  [X2-DFN0603-2]  86.35 46.75 180 bottom
D21  DESD5V0X1BCSF  [X2-DFN0603-2]  86.35 45.45 180 bottom
D22  DESD5V0X1BCSF  [X2-DFN0603-2]  86.35 44.15 180 bottom
D23  DESD5V0X1BCSF  [X2-DFN0603-2]  85.05 34.75 0 bottom
D24  DESD5V0X1BCSF  [X2-DFN0603-2]  85.05 33.65 0 bottom
D25  DESD5V0X1BCSF  [X2-DFN0603-2]  85.05 32.55 0 bottom
D26  DESD5V0X1BCSF  [X2-DFN0603-2]  85.05 30.35 0 bottom
D27  DESD5V0X1BCSF  [X2-DFN0603-2]  85.05 28.15 0 bottom
D28  DESD5V0X1BCSF  [X2-DFN0603-2]  85.05 27.05 0 bottom
D29  DESD5V0X1BCSF  [X2-DFN0603-2]  85.05 25.95 0 bottom
D30  PUSB3FR4  [XSON10_0P5_1P1X2P6MM]  53.99 22.09 90 bottom
D31  PUSB3FR4  [XSON10_0P5_1P1X2P6MM]  50.75 22 90 bottom
J1  M.2 SLOT (KEY - M)  [CON67_0P5_TYPE_M_22P1X6P05_RA]  87.5 88 270 top
J2  CON_1X6  [CON1X6_1P25_10P75X4P05_SM_RA]  97.5 82.5 90 top
J3  CON 2X25  [CON_2X25_0P4_12P6X2P94_SMT]  85.5 71.5 180 top
J4  CON 2X25  [CON_2X25_0P4_12P6X2P94_SMT]  71.75 53.25 0 top
J5  CON 6+1 SIM CARD  [CON_NANOSIM_7F_1P27_SM_RA]  91.5 49 90 top
J6  CONN_SD_CARD 9  [CON9_SDCARD_MSD-1-A]  90.5 32.5 90 top
J7  SHF-105-01-L-D-RA  [CON2X5_50_TH_RA]  91.8 17.65 270 top
J8  CON_RJ45  [CON_RJ45_14F_50_TH_RA_A]  57.5 15.5 0 top
J9  CON 1X2 PLUG  [HDR_1X2_3MM_RA_TH]  11.75 9.25 0 top
J10  SM02B-GHS-TB(LF)(SN)  [CON_1X2_1P25_5P8X4P1_SM_RA]  19.75 97.5 180 top
J11  1X2  [CON2_1MM_SM_RA_4P25X4]  11 97.25 0 bottom
J12  USB_TYPE_C  [CON16F_USB_TYPE-C_RA_SM]  71.19 97.17 0 bottom
J13  USB_TYPE_C  [CON24_USB_TYPE-C_0P5_SM_RA_LDI]  31.64 96.86 0 bottom
J14  CON 2X20  [CON_2X20_0P4_10P6X2P94_SMT]  62.5 87 270 bottom
J15  CON 2X20  [CON_2X20_0P4_10P6X2P94_SMT]  37.5 81 90 bottom
J16  M.2 SKT KEY-B  [CON75_PCIE_KEY_B_0P5_22X6_RA]  85 61.5 180 bottom
J17  CON 2X25  [CON_2X25_0P4_12P6X2P94_SMT]  63.25 24.2 90 bottom
J18  U.FL  [CON_3_UFL_R_SMT]  77.8 2.25 180 bottom
J19  U.FL  [CON_3_UFL_R_SMT]  70.8 2.25 180 bottom
L1  600 OHM@100MHz  [IND_0603]  61.5 79 270 top
L2  0.47 uH  [IND2520]  10.4 70.2 180 top
L3  0.47 uH  [IND2520]  25.5 67.7 0 top
L4  0.47 uH  [IND2520]  9.35 67.5 180 top
L5  0.47 uH  [IND2520]  25.5 64.9 0 top
L6  0.47uH  [IND_3P2X3P5MM_SM]  9.7 64.2 180 top
L7  100nH  [IND3_2P5_SQ5P2MM]  70.35 62.57 0 top
L8  120OHM@100MHZ  [IND_0603]  31.35 61.8 180 bottom
L9  120OHM@100MHZ  [IND_0603]  30.75 72.75 180 top
L10  1.0uH  [IND2_10P9X10P4]  7.25 30.75 180 top
L11  1.0uH  [IND2_10P9X10P4]  31.75 30.5 270 top
L12  1.0uH  [IND2_10P9X10P4]  43 30.5 90 top
L13  100nH  [IND3_2P5_SQ5P2MM]  68.12 23.55 270 top
L14  800Ohms@100MHz  [IND2220_152H]  22.25 14.75 0 top
L15  800Ohms@100MHz  [IND2220_152H]  22.25 4.25 0 top
L16  120 Ohm  [IND_0402]  18.85 88.3 45 bottom
L17  2.2UH  [IND_0806_SM]  59.05 32.25 0 bottom
NOREF  -  []  96 4 90 top
NOREF#2  -  []  86 78 90 top
NOREF#3  -  []  84.86 33.65 0 top
NOREF#4  -  []  18.8 79.7 90 top
NOREF#5  -  []  94 58.27 90 top
NOREF#6  -  []  71 90.9 0 top
NOREF#7  -  []  79.25 92.26 0 top
NOREF#8  -  []  35.04 94.99 90 top
NOREF#9  -  []  18.58 55.61 90 top
NOREF#10  -  []  16.05 88.5 90 top
NOREF#11  -  []  84.86 28.15 0 top
NOREF#12  -  []  85.37 32.72 90 top
NOREF#13  -  []  61.92 94.58 0 top
NOREF#14  -  []  57.5 9.15 90 top
NOREF#15  -  []  84.73 28.32 0 top
NOREF#16  -  []  84 58.95 0 top
NOREF#17  -  []  27.95 90.16 90 top
NOREF#18  -  []  8.97 95.1 90 top
NOREF#19  -  []  88.72 71.65 90 top
NOREF#20  -  []  86.67 56.37 0 top
NOREF#21  -  []  99.55 77.1 90 top
NOREF#22  -  []  94.29 8.7 0 top
NOREF#23  -  []  25.3 12.09 90 top
NOREF#24  -  []  78.75 83.58 0 top
NOREF#25  -  []  24.45 64.9 0 top
NOREF#26  -  []  54.96 15.5 0 top
NOREF#27  -  []  15.92 31.17 0 top
NOREF#28  -  []  21.09 35.13 0 top
NOREF#29  -  []  62.77 94.67 90 top
NOREF#30  -  []  95.1 19.65 90 top
NOREF#31  -  []  7.6 45.27 90 top
NOREF#32  -  []  94.29 8.7 90 top
NOREF#33  -  []  98.86 96.9 0 top
NOREF#34  -  []  96 58.48 0 top
NOREF#35  -  []  41.05 38.65 90 top
NOREF#36  -  []  14.32 29.2 0 top
NOREF#37  -  []  60.98 60.95 90 top
NOREF#38  -  []  79.06 75.72 90 top
NOREF#39  -  []  35.96 84.8 0 top
NOREF#40  -  []  80.15 97.25 90 top
NOREF#41  -  []  112.97 24.95 90 top
NOREF#42  -  []  11.55 47.5 90 top
NOREF#43  -  []  15.92 22.67 0 top
NOREF#44  -  []  31.55 90.35 0 top
NOREF#45  -  []  9.2 98.7 0 top
NOREF#46  -  []  1.1 53.65 0 top
NOREF#47  -  []  23.64 35.13 0 top
NOREF#48  -  []  59.76 -1.83 90 top
NOREF#49  -  []  54.25 82.75 0 top
NOREF#50  -  []  1.27 76.22 90 top
NOREF#51  -  []  68.79 93.57 0 top
NOREF#52  -  []  27.07 84.79 0 top
NOREF#53  -  []  81.7 54.05 90 top
NOREF#54  -  []  70.79 90.69 90 top
NOREF#55  -  []  86.67 43.98 0 top
NOREF#56  -  []  16.85 95.45 90 top
NOREF#57  -  []  65.35 51.68 0 top
NOREF#58  -  []  95.25 85.62 90 top
NOREF#59  -  []  6.25 47.65 0 top
NOREF#60  -  []  34.5 82.55 90 top
NOREF#61  -  []  1.17 76.95 90 top
NOREF#62  -  []  1.27 81.22 90 top
NOREF#63  -  []  112.62 93 90 top
NOREF#64  -  []  80.59 95.33 90 top
NOREF#65  -  []  87.32 43.98 90 top
NOREF#66  -  []  33.42 83.25 0 top
NOREF#67  -  []  22.07 84.7 90 top
NOREF#68  -  []  15.92 31.17 90 top
NOREF#69  -  []  15.79 21.72 0 top
NOREF#70  -  []  92 58.27 0 top
NOREF#71  -  []  21.09 26.63 0 top
NOREF#72  -  []  15.1 35.13 0 top
NOREF#73  -  []  21.92 22.67 0 top
NOREF#74  -  []  13.9 4.93 90 top
NOREF#75  -  []  20.79 20.51 0 top
NOREF#76  -  []  69.94 93.57 0 top
NOREF#77  -  []  80.53 90.47 90 top
NOREF#78  -  []  98.86 72.9 0 top
NOREF#79  -  []  68.46 18.99 90 top
NOREF#80  -  [unnamed#2]  33.22 66.06 90 top
NOREF#81  -  [unnamed#2]  61.08 38.2 90 top
NOREF#82  -  []  95.45 87.9 0 top
NOREF#83  -  []  18.24 20.87 90 top
NOREF#84  -  []  85.37 30.52 90 top
NOREF#85  -  []  86.16 49.35 0 top
NOREF#86  -  []  84.28 93 90 top
NOREF#87  -  []  31.34 90.14 0 top
NOREF#88  -  []  86.67 56.37 0 top
NOREF#89  -  []  9.6 4.93 0 top
NOREF#90  -  []  81.67 31.32 90 top
NOREF#91  -  []  73.67 85.36 0 top
NOREF#92  -  []  68.55 51.71 0 top
NOREF#93  -  []  4 96 0 top
NOREF#94  -  []  35.96 93.64 90 top
NOREF#95  -  []  29.55 83.3 90 top
NOREF#96  -  []  6.86 72.9 0 top
NOREF#97  -  []  4 4 0 top
NOREF#98  -  []  23.49 30.22 90 top
NOREF#99  -  [unnamed#2]  90.5 3 0 top
NOREF#100  -  []  84.73 26.12 0 top
NOREF#101  -  []  49.3 31.25 0 top
NOREF#102  -  []  31.95 90.35 90 top
NOREF#103  -  []  33.15 30.25 90 top
NOREF#104  -  []  71.58 85.7 0 top
NOREF#105  -  []  15.92 31.17 0 top
NOREF#106  -  []  90.5 32.5 0 top
NOREF#107  -  []  35.96 93.64 90 top
NOREF#108  -  []  68.24 19.24 90 top
NOREF#109  -  []  84.73 32.72 0 top
NOREF#110  -  []  90.53 93 0 top
NOREF#111  -  []  68.5 91 0 top
NOREF#112  -  []  4 4 0 top
NOREF#113  -  []  76 58.27 0 top
NOREF#114  -  []  38.9 90.75 90 top
NOREF#115  -  []  34.5 83.6 90 top
NOREF#116  -  []  11.4 48.3 90 top
NOREF#117  -  []  82.75 25.95 90 top
NOREF#118  -  []  85.37 28.32 90 top
NOREF#119  -  []  30.22 33.5 0 top
NOREF#120  -  []  78.15 51.68 90 top
NOREF#121  -  []  85 54.89 0 top
NOREF#122  -  []  33.3 82.55 0 top
NOREF#123  -  []  83.2 58.95 90 top
NOREF#124  -  []  84.86 25.95 0 top
NOREF#125  -  []  0.3 43.7 0 top
NOREF#126  -  []  79.35 97.65 0 top
NOREF#127  -  []  69.5 9.3 0 top
NOREF#128  -  []  1.27 81.22 0 top
NOREF#129  -  []  8.97 99.4 0 top
NOREF#130  -  []  10.5 94.83 90 top
NOREF#131  -  []  60.96 83.2 0 top
NOREF#132  -  []  50.27 83.55 0 top
NOREF#133  -  []  98.45 77.53 90 top
NOREF#134  -  []  74.08 94.64 90 top
NOREF#135  -  []  86.67 46.58 0 top
NOREF#136  -  []  51.05 82.78 90 top
NOREF#137  -  []  15 54.4 90 top
NOREF#138  -  []  67.86 4.9 0 top
NOREF#139  -  []  67.65 84.9 90 top
NOREF#140  -  []  33.34 90.14 0 top
NOREF#141  -  []  6.1 41.8 90 top
NOREF#142  -  []  95.25 79.38 0 top
NOREF#143  -  []  72.65 85 90 top
NOREF#144  -  []  22.07 86.3 0 top
NOREF#145  -  []  94.29 8.7 90 top
NOREF#146  -  []  96.36 44 90 top
NOREF#147  -  []  85 42.89 90 top
NOREF#148  -  []  68 61.32 90 top
NOREF#149  -  []  -27.15 -84.37 0 top
NOREF#150  -  []  64.04 90.4 90 top
NOREF#151  -  []  22.07 84.7 90 top
NOREF#152  -  []  56.65 42.63 90 top
NOREF#153  -  []  85 42.89 90 top
NOREF#154  -  []  86.67 47.88 0 top
NOREF#155  -  []  53.05 82.78 0 top
NOREF#156  -  []  18.58 43.01 90 top
NOREF#157  -  []  43 25.98 90 top
NOREF#158  -  []  10.95 45.15 90 top
NOREF#159  -  []  83.8 39.35 0 top
NOREF#160  -  []  66.62 101.05 0 top
NOREF#161  -  []  95.25 79.38 90 top
NOREF#162  -  []  81.03 31.32 0 top
NOREF#163  -  []  79.1 69.93 90 top
NOREF#164  -  []  17.5 83.72 0 top
NOREF#165  -  []  15.04 20.87 0 top
NOREF#166  -  []  24.24 20.87 90 top
NOREF#167  -  []  56.55 72.7 90 top
NOREF#168  -  []  88.72 72.35 0 top
NOREF#169  -  []  70 89.5 90 top
NOREF#170  -  []  8 3.38 0 top
NOREF#171  -  []  6.86 40.9 0 top
NOREF#172  -  []  11.75 9.25 90 top
NOREF#173  -  []  84.28 79 90 top
NOREF#174  -  []  18 79.78 90 top
NOREF#175  -  []  5.65 27.25 90 top
NOREF#176  -  []  45 4.58 0 top
NOREF#177  -  []  84.86 27.05 0 top
NOREF#178  -  []  75.4 24.07 90 top
NOREF#179  -  []  10.75 68.65 0 top
NOREF#180  -  []  82.75 25.95 0 top
NOREF#181  -  []  29.5 82.45 90 top
NOREF#182  -  []  69.2 61.6 0 top
NOREF#183  -  []  35.93 75.6 90 top
NOREF#184  -  []  56.3 73.75 90 top
NOREF#185  -  []  17.63 26.63 0 top
NOREF#186  -  []  75.51 98.32 90 top
NOREF#187  -  []  29 90.75 0 top
NOREF#188  -  []  74.39 93.57 90 top
NOREF#189  -  []  67.99 93.57 0 top
NOREF#190  -  []  84.86 34.75 0 top
NOREF#191  -  []  21.85 84.45 90 top
NOREF#192  -  []  83.2 59.75 0 top
NOREF#193  -  []  79.31 95.33 0 top
NOREF#194  -  []  70.94 93.57 0 top
NOREF#195  -  []  93.35 24.75 90 top
NOREF#196  -  []  14.79 29.01 0 top
NOREF#197  -  []  9.4 43.65 0 top
NOREF#198  -  []  86.16 44.15 0 top
NOREF#199  -  []  67.65 84.9 90 top
NOREF#200  -  []  38.05 42.52 0 top
NOREF#201  -  []  73.95 87.15 90 top
NOREF#202  -  []  33.34 90.14 90 top
NOREF#203  -  []  5.43 27.36 0 top
NOREF#204  -  []  67.65 84.9 0 top
NOREF#205  -  []  72.65 86.05 90 top
NOREF#206  -  []  96 58.48 90 top
NOREF#207  -  []  75 60 0 top
NOREF#208  -  []  14.79 20.51 0 top
NOREF#209  -  []  8.47 85.14 0 top
NOREF#210  -  []  18.15 9.5 0 top
NOREF#211  -  []  79.35 97.65 0 top
NOREF#212  -  []  10 51.13 0 top
NOREF#213  -  []  73.67 85.36 90 top
NOREF#214  -  []  29.6 91.15 0 top
NOREF#215  -  []  84.54 42.76 0 top
NOREF#216  -  []  21.65 70.3 0 top
NOREF#217  -  []  98.86 4.9 0 top
NOREF#218  -  []  68.15 70.53 0 top
NOREF#219  -  []  80.85 99.35 90 top
NOREF#220  -  []  29.01 92.96 0 top
NOREF#221  -  []  91.8 16.38 90 top
NOREF#222  -  []  96.36 44 0 top
NOREF#223  -  []  78.74 92 0 top
NOREF#224  -  []  70.75 9.97 0 top
NOREF#225  -  []  66.47 69.85 0 top
NOREF#226  -  []  1.02 99.25 0 top
NOREF#227  -  []  67.7 85.75 90 top
NOREF#228  -  []  57.65 64.05 0 top
NOREF#229  -  []  33.75 90.75 0 top
NOREF#230  -  []  66.47 68.85 90 top
NOREF#231  -  []  29.4 81.9 90 top
NOREF#232  -  []  -411.96 -308.52 0 top
NOREF#233  -  []  57.65 64.05 90 top
NOREF#234  -  []  26.45 91.64 0 top
NOREF#235  -  []  56.23 18.04 0 top
NOREF#236  -  []  61.68 17.8 90 top
NOREF#237  -  []  33.3 83.6 0 top
NOREF#238  -  []  21.92 22.67 0 top
NOREF#239  -  []  68.3 94.64 0 top
NOREF#240  -  []  13.3 89.05 0 top
NOREF#241  -  []  58.25 82.75 90 top
NOREF#242  -  []  9.2 56.3 0 top
NOREF#243  -  []  21.04 29.37 0 top
NOREF#244  -  []  67.75 59.97 90 top
NOREF#245  -  []  21.04 20.87 0 top
NOREF#246  -  []  15.55 88.55 90 top
NOREF#247  -  []  10.5 94.83 0 top
NOREF#248  -  []  87.32 46.58 90 top
NOREF#249  -  []  69.5 9.3 90 top
NOREF#250  -  []  67.55 84.35 90 top
NOREF#251  -  []  12 55.35 0 top
NOREF#252  -  []  75.51 94.14 90 top
NOREF#253  -  []  15.92 22.67 0 top
NOREF#254  -  []  84.86 32.55 0 top
NOREF#255  -  []  6.86 4.9 0 top
NOREF#256  -  []  37.65 43.85 0 top
NOREF#257  -  []  90.72 78.75 90 top
NOREF#258  -  []  85.37 27.22 90 top
NOREF#259  -  []  58.05 64.85 0 top
NOREF#260  -  []  88.3 73.04 0 top
NOREF#261  -  []  93.75 27.55 90 top
NOREF#262  -  []  28.8 90.35 0 top
NOREF#263  -  []  97.88 24.95 0 top
NOREF#264  -  []  36.21 84.79 90 top
NOREF#265  -  []  2.35 33.75 0 top
NOREF#266  -  []  80.7 52.55 0 top
NOREF#267  -  []  26.55 25.05 90 top
NOREF#268  -  []  28.18 57.01 0 top
NOREF#269  -  []  21.92 31.17 90 top
NOREF#270  -  []  80.59 95.33 90 top
NOREF#271  -  []  19.19 4.25 0 top
NOREF#272  -  []  -44.5 170 0 top
NOREF#273  -  []  71.3 19.85 0 top
NOREF#274  -  []  35.96 77.2 90 top
NOREF#275  -  []  14.55 91.95 0 top
NOREF#276  -  []  9.6 4.93 0 top
NOREF#277  -  []  14.6 71.35 90 top
NOREF#278  -  []  89.78 71.65 90 top
NOREF#279  -  []  29.4 81.9 0 top
NOREF#280  -  []  48.44 88.9 0 top
NOREF#281  -  []  19.2 1.58 0 top
NOREF#282  -  []  8.3 67.5 0 top
NOREF#283  -  []  30.35 82 0 top
NOREF#284  -  []  20.79 29.01 0 top
NOREF#285  -  []  88.95 70.6 0 top
NOREF#286  -  []  85.9 22.61 0 top
NOREF#287  -  []  84.73 33.82 0 top
NOREF#288  -  []  29.65 70.3 90 top
NOREF#289  -  []  70.03 9.97 90 top
NOREF#290  -  []  14.32 29.2 90 top
NOREF#291  -  []  71.58 84.65 0 top
NOREF#292  -  []  19.2 12.09 0 top
NOREF#293  -  []  15.04 29.37 0 top
NOREF#294  -  []  66.5 85.75 0 top
NOREF#295  -  []  21.79 30.22 0 top
NOREF#296  -  []  13.55 68.65 90 top
NOREF#297  -  []  76.55 51.71 90 top
NOREF#298  -  []  39.4 89.25 0 top
NOREF#299  -  []  48.2 25.05 90 top
NOREF#300  -  []  79.06 75.72 0 top
NOREF#301  -  []  28.59 90.14 90 top
NOREF#302  -  []  81.2 30.81 90 top
NOREF#303  -  []  61.71 21 90 top
NOREF#304  -  []  8.4 64.2 0 top
NOREF#305  -  []  3.1 44.65 0 top
NOREF#306  -  []  70.79 90.69 0 top
NOREF#307  -  []  68.75 90.75 0 top
NOREF#308  -  []  31.85 59.6 270 top
NOREF#309  -  []  18.24 29.37 90 top
NOREF#310  -  []  57.86 96.9 0 top
NOREF#311  -  []  15.1 26.63 0 top
NOREF#312  -  []  68.24 19.24 90 top
NOREF#313  -  []  17.93 27.36 90 top
NOREF#314  -  []  14.7 83.8 0 top
NOREF#315  -  []  80.42 52.26 0 top
NOREF#316  -  []  21.3 63.75 0 top
NOREF#317  -  []  98.46 42.76 90 top
NOREF#318  -  []  9.35 70.2 0 top
NOREF#319  -  []  16.85 99.55 0 top
NOREF#320  -  []  7.95 45.15 0 top
NOREF#321  -  []  58.57 4.58 90 top
NOREF#322  -  []  70.44 93.57 0 top
NOREF#323  -  []  1.27 76.22 0 top
NOREF#324  -  []  27.27 83.65 0 top
NOREF#325  -  []  98.78 36.59 0 top
NOREF#326  -  []  15.5 83.72 0 top
NOREF#327  -  []  71 90.9 90 top
NOREF#328  -  []  19.21 20.51 90 top
NOREF#329  -  []  70.17 10.75 90 top
NOREF#330  -  []  80.15 96.85 90 top
NOREF#331  -  []  65.42 86.1 0 top
NOREF#332  -  []  80.3 83.2 90 top
NOREF#333  -  []  19.21 29.01 90 top
NOREF#334  -  []  84.05 24.75 90 top
NOREF#335  -  []  17.49 30.22 90 top
NOREF#336  -  []  87.32 49.18 90 top
NOREF#337  -  []  61.68 30.6 0 top
NOREF#338  -  []  11.8 71.35 0 top
NOREF#339  -  []  86.67 49.18 0 top
NOREF#340  -  []  70.17 11.25 90 top
NOREF#341  -  []  70.03 9.97 0 top
NOREF#342  -  []  1.2 50.8 90 top
NOREF#343  -  []  9.4 45.27 90 top
NOREF#344  -  []  86.16 45.45 0 top
NOREF#345  -  []  97.61 42.5 90 top
NOREF#346  -  []  88.55 72.53 0 top
NOREF#347  -  []  33.76 94.36 0 top
NOREF#348  -  []  18.3 8.6 90 top
NOREF#349  -  []  87.32 45.28 90 top
NOREF#350  -  []  85.37 33.82 90 top
NOREF#351  -  []  84.28 80.5 90 top
NOREF#352  -  []  69.44 93.57 0 top
NOREF#353  -  []  60.93 81.6 0 top
NOREF#354  -  []  79.75 90.74 90 top
NOREF#355  -  []  23.49 21.72 90 top
NOREF#356  -  []  80.7 69.96 90 top
NOREF#357  -  []  18.3 10.4 0 top
NOREF#358  -  []  82.75 25.95 0 top
NOREF#359  -  []  14.32 20.7 0 top
NOREF#360  -  []  9.5 42.7 90 top
NOREF#361  -  []  1.17 81.95 0 top
NOREF#362  -  []  34.01 92.96 0 top
NOREF#363  -  []  27.32 98.19 0 top
NOREF#364  -  []  21.92 31.17 0 top
NOREF#365  -  []  43.81 -1.83 0 top
NOREF#366  -  []  34.26 94.36 0 top
NOREF#367  -  []  68 61.32 0 top
NOREF#368  -  []  47.86 96.9 0 top
NOREF#369  -  []  40.65 41.25 90 top
NOREF#370  -  []  29.85 36.75 0 top
NOREF#371  -  []  21.3 64.25 90 top
NOREF#372  -  []  25.3 1.58 90 top
NOREF#373  -  []  4.1 50.65 0 top
NOREF#374  -  []  33.55 90.35 0 top
NOREF#375  -  []  93.75 35.55 90 top
NOREF#376  -  []  28.59 90.14 0 top
NOREF#377  -  []  66.89 20.84 0 top
NOREF#378  -  []  31.75 25.98 90 top
NOREF#379  -  []  79.35 76.5 90 top
NOREF#380  -  []  80.26 91 90 top
NOREF#381  -  []  20 8.65 90 top
NOREF#382  -  []  46.07 18.04 0 top
NOREF#383  -  []  80.7 73.04 0 top
NOREF#384  -  []  67.75 59.97 0 top
NOREF#385  -  []  9.77 0.21 90 top
NOREF#386  -  []  95 60 90 top
NOREF#387  -  []  60.32 26.15 0 top
NOREF#388  -  []  1.17 81.95 90 top
NOREF#389  -  []  98.45 87.47 90 top
NOREF#390  -  []  50.27 83.55 90 top
NOREF#391  -  []  55 72.95 0 top
NOREF#392  -  []  21.92 31.17 0 top
NOREF#393  -  []  24.45 67.7 0 top
NOREF#394  -  []  76 58.27 0 top
NOREF#395  -  []  38.22 43.95 0 top
NOREF#396  -  []  29.5 82.45 90 top
NOREF#397  -  []  82.75 25.95 90 top
NOREF#398  -  []  32.16 90.14 90 top
NOREF#399  -  []  1.17 76.95 0 top
NOREF#400  -  []  84.5 40.02 90 top
NOREF#401  -  []  11.55 92 0 top
NOREF#402  -  []  20.32 29.2 90 top
NOREF#403  -  []  18.58 57.01 0 top
NOREF#404  -  []  35.93 86.4 0 top
NOREF#405  -  []  79.65 99.35 0 top
NOREF#406  -  []  89.55 20 0 top
NOREF#407  -  []  25.21 29.01 90 top
NOREF#408  -  []  93.02 56.37 0 top
NOREF#409  -  []  69.75 90.25 90 top
NOREF#410  -  []  66.87 25.9 0 top
NOREF#411  -  []  66.87 98.32 0 top
NOREF#412  -  []  14.32 20.7 90 top
NOREF#413  -  []  82.14 10.65 0 top
NOREF#414  -  []  78.47 92.53 0 top
NOREF#415  -  []  27.32 93.64 0 top
NOREF#416  -  []  37.65 42.63 0 top
NOREF#417  -  []  9.15 45.15 90 top
NOREF#418  -  []  34.51 92.96 90 top
NOREF#419  -  []  79.92 84.75 90 top
NOREF#420  -  []  68.5 84.45 0 top
NOREF#421  -  []  33.42 82.2 0 top
NOREF#422  -  []  19.19 14.75 0 top
NOREF#423  -  []  21.85 86.55 0 top
NOREF#424  -  []  85.37 34.92 90 top
NOREF#425  -  []  23.64 26.63 0 top
NOREF#426  -  []  62.98 94.58 90 top
NOREF#427  -  []  66.66 21.09 0 top
NOREF#428  -  []  79.1 73.07 0 top
NOREF#429  -  []  90.5 77.65 90 top
NOREF#430  -  []  84.73 27.22 0 top
NOREF#431  -  []  61.71 29 0 top
NOREF#432  -  []  84.73 34.92 0 top
NOREF#433  -  []  86.67 45.28 0 top
NOREF#434  -  []  21.48 66.55 90 top
NOREF#435  -  []  59.62 60.95 0 top
NOREF#436  -  []  22 88.59 90 top
NOREF#437  -  []  17.3 98.45 0 top
NOREF#438  -  []  66.95 51.71 0 top
NOREF#439  -  []  74.8 19.85 90 top
NOREF#440  -  []  22.52 89.1 90 top
NOREF#441  -  []  72.7 61.6 90 top
NOREF#442  -  []  5.45 47.5 0 top
NOREF#443  -  []  29.5 82.45 0 top
NOREF#444  -  []  49.3 25.15 90 top
NOREF#445  -  []  82.75 25.95 90 top
NOREF#446  -  []  3.02 50.3 0 top
NOREF#447  -  []  55.37 60.32 60 top
NOREF#448  -  []  93.75 35.55 90 top
NOREF#449  -  []  61.71 19.4 90 top
NOREF#450  -  []  21.3 61.45 90 top
NOREF#451  -  []  27.7 90.9 90 top
NOREF#452  -  []  64.07 81.6 90 top
NOREF#453  -  []  20.32 29.2 0 top
NOREF#454  -  []  61.35 60.6 90 top
NOREF#455  -  []  76.08 25.25 90 top
NOREF#456  -  []  21.3 66.55 0 top
NOREF#457  -  []  13.8 90.25 90 top
NOREF#458  -  []  9.5 44.6 0 top
NOREF#459  -  []  38.62 88.95 90 top
NOREF#460  -  []  57.5 9.15 90 top
NOREF#461  -  []  28.24 94.99 0 top
NOREF#462  -  []  86 78 90 top
NOREF#463  -  []  2.73 30.75 0 top
NOREF#464  -  []  52.45 72.7 0 top
NOREF#465  -  []  59.25 60.6 0 top
NOREF#466  -  []  13.4 94.41 90 top
NOREF#467  -  []  13.73 0.21 90 top
NOREF#468  -  []  17.63 35.13 0 top
NOREF#469  -  []  15.79 30.22 0 top
NOREF#470  -  []  93.12 0 90 top
NOREF#471  -  []  1.2 52.7 0 top
NOREF#472  -  []  84.86 30.35 0 top
NOREF#473  -  []  66.87 25.9 0 top
NOREF#474  -  []  86.16 46.75 0 top
NOREF#475  -  []  20.32 20.7 90 top
NOREF#476  -  []  1.8 35.95 0 top
NOREF#477  -  []  31.64 96.35 0 top
NOREF#478  -  [unnamed#2]  3.5 91 0 top
NOREF#479  -  []  85.37 26.12 90 top
NOREF#480  -  []  21.92 22.67 90 top
NOREF#481  -  []  73.75 0.8 0 top
NOREF#482  -  []  4 4 0 top
NOREF#483  -  []  2.72 30.5 0 top
NOREF#484  -  []  81.98 52.26 90 top
NOREF#485  -  []  26.7 91.4 0 top
NOREF#486  -  []  58.57 4.58 90 top
NOREF#487  -  []  80.85 76 0 top
NOREF#488  -  [unnamed#2]  6.75 12 90 top
NOREF#489  -  []  5.3 50.65 90 top
NOREF#490  -  []  23.37 89.95 0 top
NOREF#491  -  []  6.86 96.9 0 top
NOREF#492  -  []  74.4 27.43 0 top
NOREF#493  -  []  79.31 95.33 0 top
NOREF#494  -  []  9.75 45.15 0 top
NOREF#495  -  []  76.25 9.97 0 top
NOREF#496  -  []  71.45 86.05 0 top
NOREF#497  -  []  74.45 85.65 0 top
NOREF#498  -  []  25.21 20.51 90 top
NOREF#499  -  []  28.35 83.3 0 top
NOREF#500  -  []  71.45 85 0 top
NOREF#501  -  []  89.5 58.27 0 top
NOREF#502  -  []  63.7 13.9 0 top
NOREF#503  -  []  49.45 86.95 0 top
NOREF#504  -  []  59.76 -1.83 90 top
NOREF#505  -  []  17.49 21.72 90 top
NOREF#506  -  []  8.1 62.45 90 top
NOREF#507  -  []  67.55 84.35 0 top
NOREF#508  -  []  87.32 47.88 90 top
NOREF#509  -  []  44.03 12.2 0 top
NOREF#510  -  []  0 91.75 0 top
NOREF#511  -  []  15.92 22.67 90 top
NOREF#512  -  []  46.07 9.15 0 top
NOREF#513  -  []  86.16 48.05 0 top
NOREF#514  -  []  65.52 26.15 90 top
NOREF#515  -  []  74.65 64.5 0 top
NOREF#516  -  []  66.87 94.14 0 top
NOREF#517  -  []  95.25 79.38 90 top
NOREF#518  -  []  84.73 30.52 0 top
NOREF#519  -  []  34.35 91.15 0 top
NOREF#520  -  []  8.1 65.95 0 top
NOREF#521  -  []  91.8 12.57 90 top
NOREF#522  -  []  38.62 88.95 0 top
NOREF#523  -  []  24.24 29.37 90 top
NOREF#524  -  []  98 54.89 90 top
NOREF#525  -  []  4 4 0 top
NOREF#526  -  []  77.7 83.2 0 top
NOREF#527  -  []  20.32 20.7 0 top
NOREF#528  -  []  21.79 21.72 0 top
NOREF#529  -  []  79.78 99 0 top
NOREF#530  -  []  62.12 94.67 0 top
NOREF#531  -  [unnamed#2]  3.5 91 180 bottom
NOREF#532  -  [unnamed#2]  6.75 12 270 bottom
NOREF#533  -  []  24 1 90 bottom
NOREF#534  -  [unnamed#2]  90.5 3 180 bottom
NOREF#535  -  []  19 1 90 bottom
NOREF#536  -  []  98.78 36.59 180 bottom
Q1  NX3020NAKW,115  [SC70_3]  40.3 95 180 top
Q2  NX3020NAKW,115  [SC70_3]  71.65 87.35 270 top
Q3  ISC0703NLSATMA1  [TDSON_1P27_5P35X6P1]  17 32.25 270 top
Q4  ISC0703NLSATMA1  [TDSON_1P27_5P35X6P1]  23 32.25 270 top
Q5  ISC0703NLSATMA1  [TDSON_1P27_5P35X6P1]  17 23.75 270 top
Q6  ISC0703NLSATMA1  [TDSON_1P27_5P35X6P1]  23 23.75 270 top
Q7  NX3020NAKW,115  [SC70_3]  1.7 61.3 180 bottom
Q8  NX3020NAKS  [SOT-363_0P65_SMT]  5.37 61.31 90 bottom
Q9  NX3020NAKS  [SOT-363_0P65_SMT]  5.25 57.3 90 bottom
R1  75  [RC0402_25]  11.5 97.3 270 top
R2  10K  [RC0402_25]  40.45 97.15 180 top
R3  0 OHM  [RC0402_25]  10.15 96.8 180 top
R4  10K  [RC0402_25]  11 94.5 90 top
R5  330  [RC0402_25]  12 94.5 270 top
R6  10K  [RC0402_25]  15 94.5 270 top
R7  10K  [RC0402_25]  16 94.5 270 top
R8  270K  [RC0402_25]  42.04 90.39 270 top
R9  1M  [RC0402_25]  39.85 90.25 90 top
R10  10K  [RC0402_25]  38.99 90.24 90 top
R11  10K  [RC0402_25]  22.25 87.4 0 top
R12  270K  [RC0402_25]  77.05 87.1 270 top
R13  10K  [RC0402_25]  69.55 86.8 270 top
R14  1M  [RC0402_25]  74.9 86.65 90 top
R15  10K  [RC0402_25]  74.04 86.64 90 top
R16  0 OHM  [RC0402_25]  11.75 86.5 90 top
R17  10K  [RC0402_25]  12.75 86.5 270 top
R18  10K  [RC0402_25]  13.75 86.5 270 top
R19  0 OHM  [RC0402_25]  14.75 86.5 90 top
R20  0 OHM  [RC0402_25]  20.5 86.35 180 top
R21  10K  [RC0402_25]  25.1 85.9 180 top
R22  0 OHM  [RC0402_25]  20.5 85.5 180 top
R23  0 OHM  [RC0402_25]  20.5 84.65 180 top
R24  240  [RC0402_25]  50.5 84.25 180 top
R25  10K  [RC0402_25]  22.75 83 270 top
R26  0 OHM  [RC0402_25]  12.25 82.75 180 top
R27  0 OHM  [RC0402_25]  12.25 81.75 180 top
R28  0 OHM  [RC0402_25]  6.85 81.6 90 top
R29  10K  [RC0402_25]  20.5 81 180 top
R30  0 OHM  [RC0402_25]  12.25 80.75 180 top
R31  0 OHM  [RC0402_25]  23.5 80.75 90 top
R32  0 OHM  [RC0402_25]  24.5 80.75 90 top
R33  0 OHM  [RC0402_25]  25.5 80.75 90 top
R34  0 OHM  [RC0402_25]  26.5 80.75 270 top
R35  10K  [RC0402_25]  20.5 80 180 top
R36  0 OHM  [RC0402_25]  12.25 79.75 180 top
R37  0 OHM  [RC0402_25]  28 79.5 180 top
R38  0 OHM  [RC0402_25]  7.75 79.05 90 top
R39  0 OHM  [RC0402_25]  22.25 79 180 top
R40  10K  [RC0402_25]  54.25 78.5 270 top
R41  0 OHM  [RC0402_25]  55.25 78.5 90 top
